# EAGLE board MotorCircuit (~recovered) (EAGLE 9.7.0)
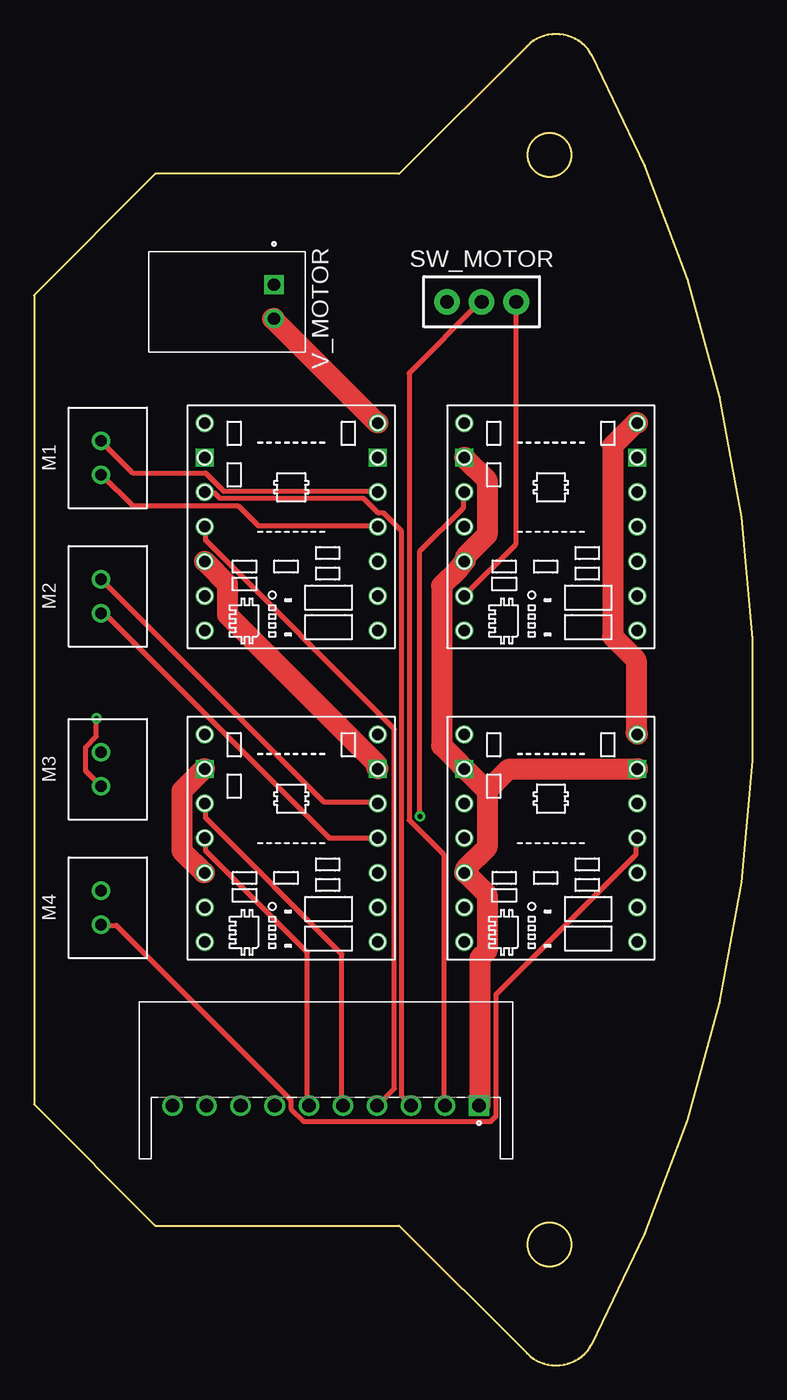
[diagram p0: board, top side]
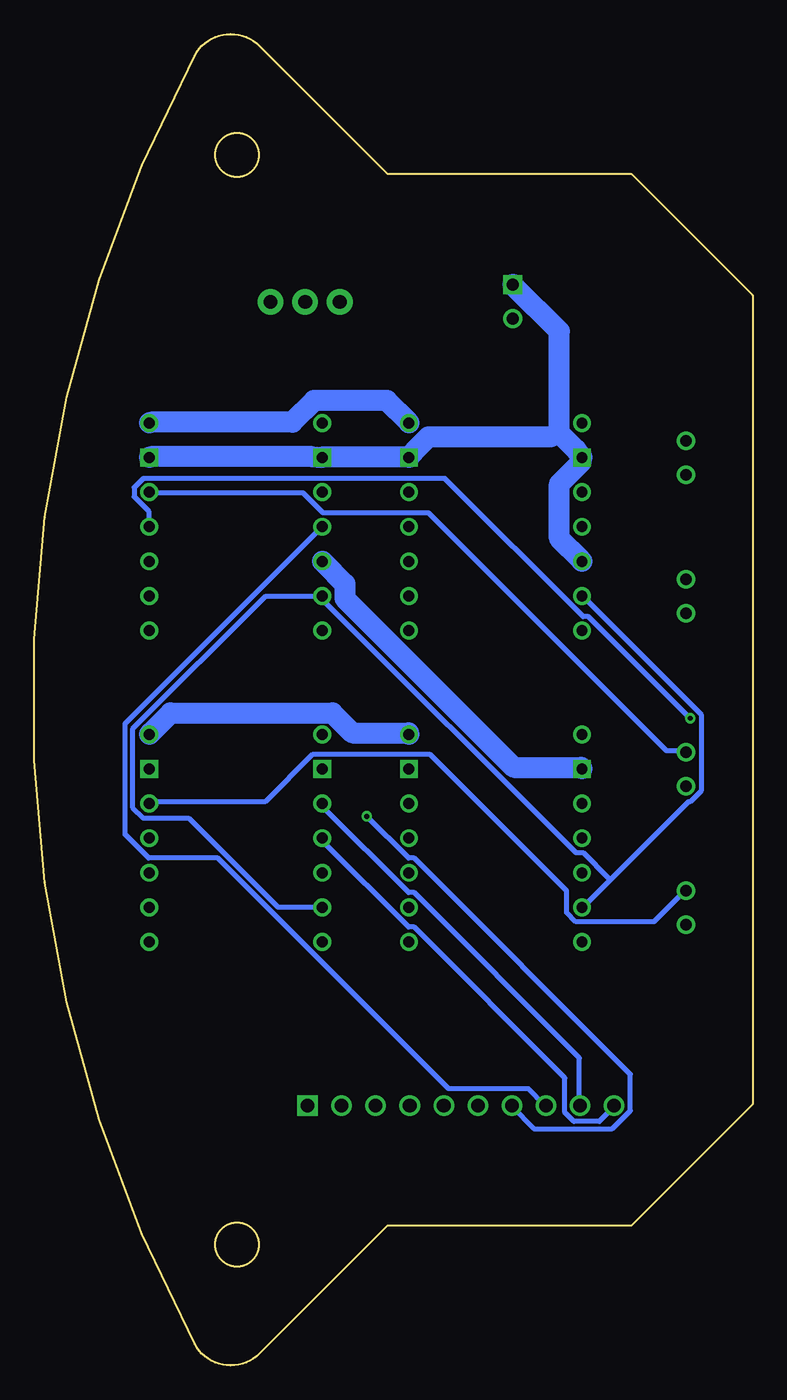
[diagram p1: board, bottom side, seen from below]

Size 52.73 x 97.74 mm. Coordinates in mm from the lower left corner, seen from the top.
Outline: 36.18,0.88 arc107 40.95,1.58 arc56 40.95,96.16 arc107 36.18,96.86 26.8,87.48 8.9,87.48 0,78.57 0,19.17 8.9,10.26 26.8,10.26 36.18,0.88
Outline: circle at 37.83,8.87 radius 1.6
Outline: circle at 37.83,88.87 radius 1.6
Copper layers (1*16): Top / Bottom
Stack-up Default Layer Stack: Top User Defined 0.035mm / Dielectric-1 User Defined 1.5mm / Bottom User Defined 0.035mm
Design rules: minimum drill size 0.35mm, minimum copper width classes=0 15mil, minimum copper width classes=1 60mil, minimum copper width 6mil, keepout clearance 0mil, drill distance 6mil, via restrict clearance 0mil, dimension clearance 40mil, restrict clearance 0mil, copper clearance wire_polygon to wire_polygon 6mil, copper clearance wire_polygon to pad_smd 6mil, copper clearance wire_polygon to via 6mil, copper clearance pad_smd to pad_smd 6mil, copper clearance pad_smd to via 6mil, copper clearance via to via 6mil, copper clearance smd to pad (same net) 6mil, copper clearance smd to via (same net) 6mil, copper clearance smd to smd (same net) 6mil
Net classes: 0 default: width 0.381 mm; 1 power: width 1.524 mm

## Footprints (pad centres in the part's own frame; a part is rotated, then mirrored left to right if it is on the bottom)
DRV8874 = drill 0.8: !FAULT 6.35,-6.35; !SLEEP -6.35,-6.35; CS 6.35,-8.89; EN/IN1 -6.35,1.27; IMODE 6.35,-3.81; OUT1 6.35,1.27; OUT2 6.35,-1.27; PH/IN2 -6.35,-1.27; PMODE -6.35,-3.81; VIN 6.35,6.35; VM -6.35,6.35; VREF -6.35,-8.89 | drill 0.8 square: GND1 -6.35,3.81; GND2 6.35,3.81
JST_S10B-XH-A-1(LF)(SN) = drill 1 square: 1 -11.25,1.85 | drill 1: 2 -8.75,1.85; 3 -6.25,1.85; 4 -3.75,1.85; 5 -1.25,1.85; 6 1.25,1.85; 7 3.75,1.85; 8 6.25,1.85; 9 8.75,1.85; 10 11.25,1.85
B2B-XH-A = drill 0.84: 1 0,0; 2 2.5,0
SWITCH-SPDT-PTH-8.5X3.7MM = drill 1.016 pad 1.88: 1 -2.54,0; 2 0,0; 3 2.54,0
S2B-XH-A = drill 0.9 square: 1 0,0 | drill 0.9: 2 2.5,0

## Placement (x,y rotation side)
DRV_M1  DRV8874  [DRV8874]  18.87,62.84 0 top
DRV_M2  DRV8874  [DRV8874]  18.87,39.98 0 top
DRV_M4  DRV8874  [DRV8874]  37.92,39.98 0 top
J1  S10B-XH-A-1(LF)(SN)  [JST_S10B-XH-A-1(LF)(SN)]  21.41,20.93 180 top
M1  B2B-XH-A  [B2B-XH-A]  4.9,65.38 90 top
M2  B2B-XH-A  [B2B-XH-A]  4.9,55.22 90 top
M3  B2B-XH-A  [B2B-XH-A]  4.9,42.52 90 top
M4  B2B-XH-A  [B2B-XH-A]  4.9,32.36 90 top
MRV_M3  DRV8874  [DRV8874]  37.92,62.84 0 top
SW_MOTOR  TOGGLE  [SWITCH-SPDT-PTH-8.5X3.7MM]  32.84,78.08 0 top
V_MOTOR  S2B-XH-A  [S2B-XH-A]  17.6,79.35 270 top

## Library data of the parts
DRV_M1 DRV_M2 DRV_M4 MRV_M3 = DRV8874
J1 = S10B-XH-A-1_LF__SN_; AVAILABILITY: In Stock; CHECK_PRICES: https://www.snapeda.com/parts/S10B-XH-A-1(LF)(SN)/JST/view-part/?ref=eda; DESCRIPTION: Connector Header Through Hole, Right Angle 10 position 0.098 (2.50mm); MF: JST Sales; MP: S10B-XH-A-1(LF)(SN); PACKAGE: None; PRICE: None; SNAPEDA_LINK: https://www.snapeda.com/parts/S10B-XH-A-1(LF)(SN)/JST/view-part/?ref=snap
M1-M4 = Connector; CATEGORY: Header; DESCRIPTION: Connector Header Through Hole 2 position 0.098" (2.50mm); MANUFACTURER: JST Sales America Inc.; MPN: B2B-XH-A(LF)(SN); OPERATING_TEMPERATURE: -25°C ~ 85°C; PART_STATUS: ACTIVE; PITCH: 0.098" (2.50mm); ROHS_COMPLIANCE: ROHS3 Compliant; SERIES: XH; SUB_CATEGORY: Rectangular Connectors; TYPE: Header, Male Pin, Board to Cable/Wire, Through Hole
SW_MOTOR = Tinkercad
V_MOTOR = Connector; CATEGORY: Headers; DESCRIPTION: Connector Header Through Hole, Right Angle 2 position 0.098" (2.50mm); MANUFACTURER: JST Sales America Inc.; MPN: S2B-XH-A-1(LF)(SN); OPERATING_TEMPERATURE: -25°C ~ 85°C; PART_STATUS: Active; PITCH: 0.098" (2.50mm); ROHS_COMPLIANCE: ROHS3 Compliant; SERIES: XH; SUB-CATEGORY: Rectangular Connectors; TYPE: Header, Male Pin, Board to Cable/Wire, Through Hole

## Nets
5V: J1.2 SW_MOTOR.2
!SLEEP: DRV_M1.!SLEEP DRV_M2.!SLEEP DRV_M4.!SLEEP MRV_M3.!SLEEP SW_MOTOR.3
GND [power]: DRV_M1.GND1 DRV_M1.GND2 DRV_M1.PMODE DRV_M2.GND1 DRV_M2.GND2 DRV_M2.PMODE DRV_M4.GND1 DRV_M4.GND2 DRV_M4.PMODE J1.1 MRV_M3.GND1 MRV_M3.GND2 MRV_M3.PMODE V_MOTOR.1
M1_1: DRV_M1.OUT1 M1.2
M1_2: DRV_M1.OUT2 M1.1
M1_D1: DRV_M1.EN/IN1 J1.3
M1_D2: DRV_M1.PH/IN2 J1.4
M2_1: DRV_M2.OUT1 M2.2
M2_2: DRV_M2.OUT2 M2.1
M2_D1: DRV_M2.EN/IN1 J1.5
M2_D2: DRV_M2.PH/IN2 J1.6
M3_1: M3.2 MRV_M3.OUT1
M3_2: M3.1 MRV_M3.OUT2
M3_D1: J1.7 MRV_M3.EN/IN1
M3_D2: J1.8 MRV_M3.PH/IN2
M4_1: DRV_M4.OUT1 M4.2
M4_2: DRV_M4.OUT2 M4.1
M4_D1: DRV_M4.EN/IN1 J1.9
M4_D2: DRV_M4.PH/IN2 J1.10
VM [power]: DRV_M1.VIN DRV_M2.VIN DRV_M4.VIN MRV_M3.VIN V_MOTOR.2

## Tracks (layer width: path | path; a pad name or v marks a point on that pad's centre or on a via)
5V
  Top 0.381: J1.2 30.05,19.11 30.05,37.51 27.52,40.04 27.52,72.85 32.72,78.05 SW_MOTOR.2
!SLEEP
  Top 0.381: SW_MOTOR.3 35.38,78.05 35.38,60.31 31.65,56.58 MRV_M3.!SLEEP
  Bottom 0.381: 10.45,35.64 4.71,41.38 4.58,41.38 3.78,42.18 3.78,47.78 12.45,56.45 DRV_M1.!SLEEP | 10.45,35.64 12.45,33.64 DRV_M2.!SLEEP | DRV_M4.!SLEEP 31.65,33.64 34.85,33.64 41.38,40.18 44.72,40.18 45.52,40.98 45.52,46.71 35.78,56.45 31.65,56.45 MRV_M3.!SLEEP 31.65,56.31 12.98,37.64 12.45,37.64 10.58,35.78 10.45,35.64
GND
  Top 1.524: DRV_M2.GND2 25.12,43.91 25.12,44.18 14.18,55.11 14.18,57.38 12.58,58.98 DRV_M1.PMODE | 31.65,36.18 31.65,36.44 33.25,38.04 33.25,42.18 | 33.25,42.18 31.65,43.78 DRV_M4.GND1 31.12,44.31 29.92,45.51 29.92,57.25 31.12,58.45 MRV_M3.PMODE 31.65,59.11 31.65,59.38 33.25,60.98 33.25,64.98 31.65,66.58 MRV_M3.GND1 | 31.65,36.18 DRV_M4.PMODE | DRV_M4.GND2 44.18,43.78 34.85,43.78 33.78,42.71 33.25,42.18 | J1.1 32.72,19.11 32.72,29.91 33.25,30.44 33.25,34.58 32.18,35.64 31.65,36.18 | DRV_M2.PMODE 12.45,36.18 10.85,37.78 10.85,42.18 12.45,43.78 DRV_M2.GND1
  Bottom 1.524: DRV_M1.PMODE 12.58,59.11 14.18,60.71 14.18,64.71 12.58,66.31 12.58,66.58 DRV_M1.GND1 12.98,67.25 14.18,68.45 | 14.18,68.45 14.18,75.92 17.51,79.25 V_MOTOR.1 | MRV_M3.GND2 44.18,66.71 32.32,66.71 MRV_M3.GND1 31.52,66.71 25.25,66.71 DRV_M1.GND2 24.72,67.25 23.78,68.18 14.85,68.18 14.18,68.45 | DRV_M2.GND1 12.58,43.91 17.51,43.91 29.92,56.31 29.92,57.38 31.52,58.98 MRV_M3.PMODE
M1_1
  Top 0.381: DRV_M1.OUT1 25.12,64.18 13.91,64.18 12.58,65.51 7.25,65.51 4.98,67.78 M1.2
M1_2
  Top 0.381: DRV_M1.OUT2 25.12,61.65 16.45,61.65 14.98,63.11 7.25,63.11 4.98,65.38 M1.1
M1_D1
  Top 0.381: DRV_M1.EN/IN1 12.58,64.05 13.25,64.05 13.65,63.65 24.18,63.65 25.25,62.58 25.65,62.58 26.98,61.25 26.98,19.77 27.65,19.11 J1.3
M1_D2
  Top 0.381: DRV_M1.PH/IN2 12.58,61.51 12.58,60.58 26.45,46.71 26.45,20.31 25.25,19.11 J1.4
M2_1
  Top 0.381: DRV_M2.OUT1 25.12,41.38 21.25,41.38 4.98,57.65 M2.2
M2_2
  Top 0.381: DRV_M2.OUT2 25.12,38.71 21.65,38.71 5.25,55.11 4.98,55.11 M2.1
M2_D1
  Top 0.381: DRV_M2.EN/IN1 12.58,41.24 12.58,40.18 22.58,30.18 22.58,19.11 J1.5
M2_D2
  Top 0.381: DRV_M2.PH/IN2 12.58,38.71 12.58,37.78 20.05,30.31 20.05,19.11 J1.6
M3_1
  Bottom 0.381: MRV_M3.OUT1 44.18,64.05 32.98,64.05 31.52,62.58 23.78,62.58 6.31,45.11 4.98,45.11 M3.2
M3_2  (via drill 0.35)
  Top 0.381: v4.58,47.51 4.58,46.18 3.78,45.38 3.78,43.64 4.85,42.58 M3.1
  Bottom 0.381: v4.58,47.51 12.05,54.98 12.45,54.98 22.58,65.11 44.72,65.11 45.38,64.45 45.38,63.78 44.32,62.71 44.32,61.65 MRV_M3.OUT2
M3_D1  (via drill 0.35)
  Top 0.381: v28.32,40.31 28.32,59.78 31.52,62.98 31.52,64.05 MRV_M3.EN/IN1
  Bottom 0.381: v28.32,40.31 25.25,37.24 24.85,37.24 8.98,21.38 8.98,18.71 10.31,17.37 16.05,17.37 17.65,18.97 J1.7
M3_D2
  Bottom 0.381: MRV_M3.PH/IN2 31.65,61.51 46.05,47.11 46.05,38.98 44.32,37.24 39.25,37.24 22.32,20.31 16.45,20.31 15.25,19.11 J1.8
M4_1
  Bottom 0.381: DRV_M4.OUT1 44.18,41.38 35.78,41.38 32.32,44.84 23.65,44.84 13.65,34.84 13.65,33.24 12.98,32.58 7.25,32.58 4.98,34.84 M4.2
M4_2
  Top 0.381: DRV_M4.OUT2 44.18,38.71 44.18,37.51 33.92,27.24 33.92,18.31 33.52,17.91 19.78,17.91 18.85,18.84 18.85,19.51 6.05,32.31 4.98,32.31 M4.1
M4_D1
  Bottom 0.381: DRV_M4.EN/IN1 31.52,41.24 31.52,40.98 25.25,34.71 24.85,34.71 12.71,22.58 12.71,19.11 J1.9
M4_D2
  Bottom 0.381: DRV_M4.PH/IN2 31.52,38.71 31.52,38.44 25.25,32.18 24.85,32.18 13.78,21.11 13.78,18.57 13.11,17.91 11.25,17.91 10.18,18.97 J1.10
VM
  Top 1.524: DRV_M1.VIN 25.12,69.25 17.51,76.85 V_MOTOR.2 | DRV_M4.VIN 44.18,46.44 44.18,51.78 42.45,53.51 42.45,67.51 44.18,69.25 MRV_M3.VIN
  Bottom 1.524: DRV_M2.VIN 25.25,46.44 29.38,46.44 30.85,47.91 42.72,47.91 44.18,46.44 DRV_M4.VIN | MRV_M3.VIN 44.18,69.25 33.78,69.25 32.18,70.85 26.85,70.85 25.25,69.25 DRV_M1.VIN